# Altium PCB Vibration_Datalogger.PcbDoc (part 1 of 7)
Units mm, origin at the board's own origin, x right, y up, seen from the top; angles counter-clockwise.
Board outline 75.58 x 57.4 mm, 4 copper layers (Top Layer, Int1 (GND), Int2 (PWR), Bottom Layer), stack 1.44 mm thick; 126 components, 59 nets, 413 pads, 160 vias.
Unrouted connection lines stored in the file: 53.
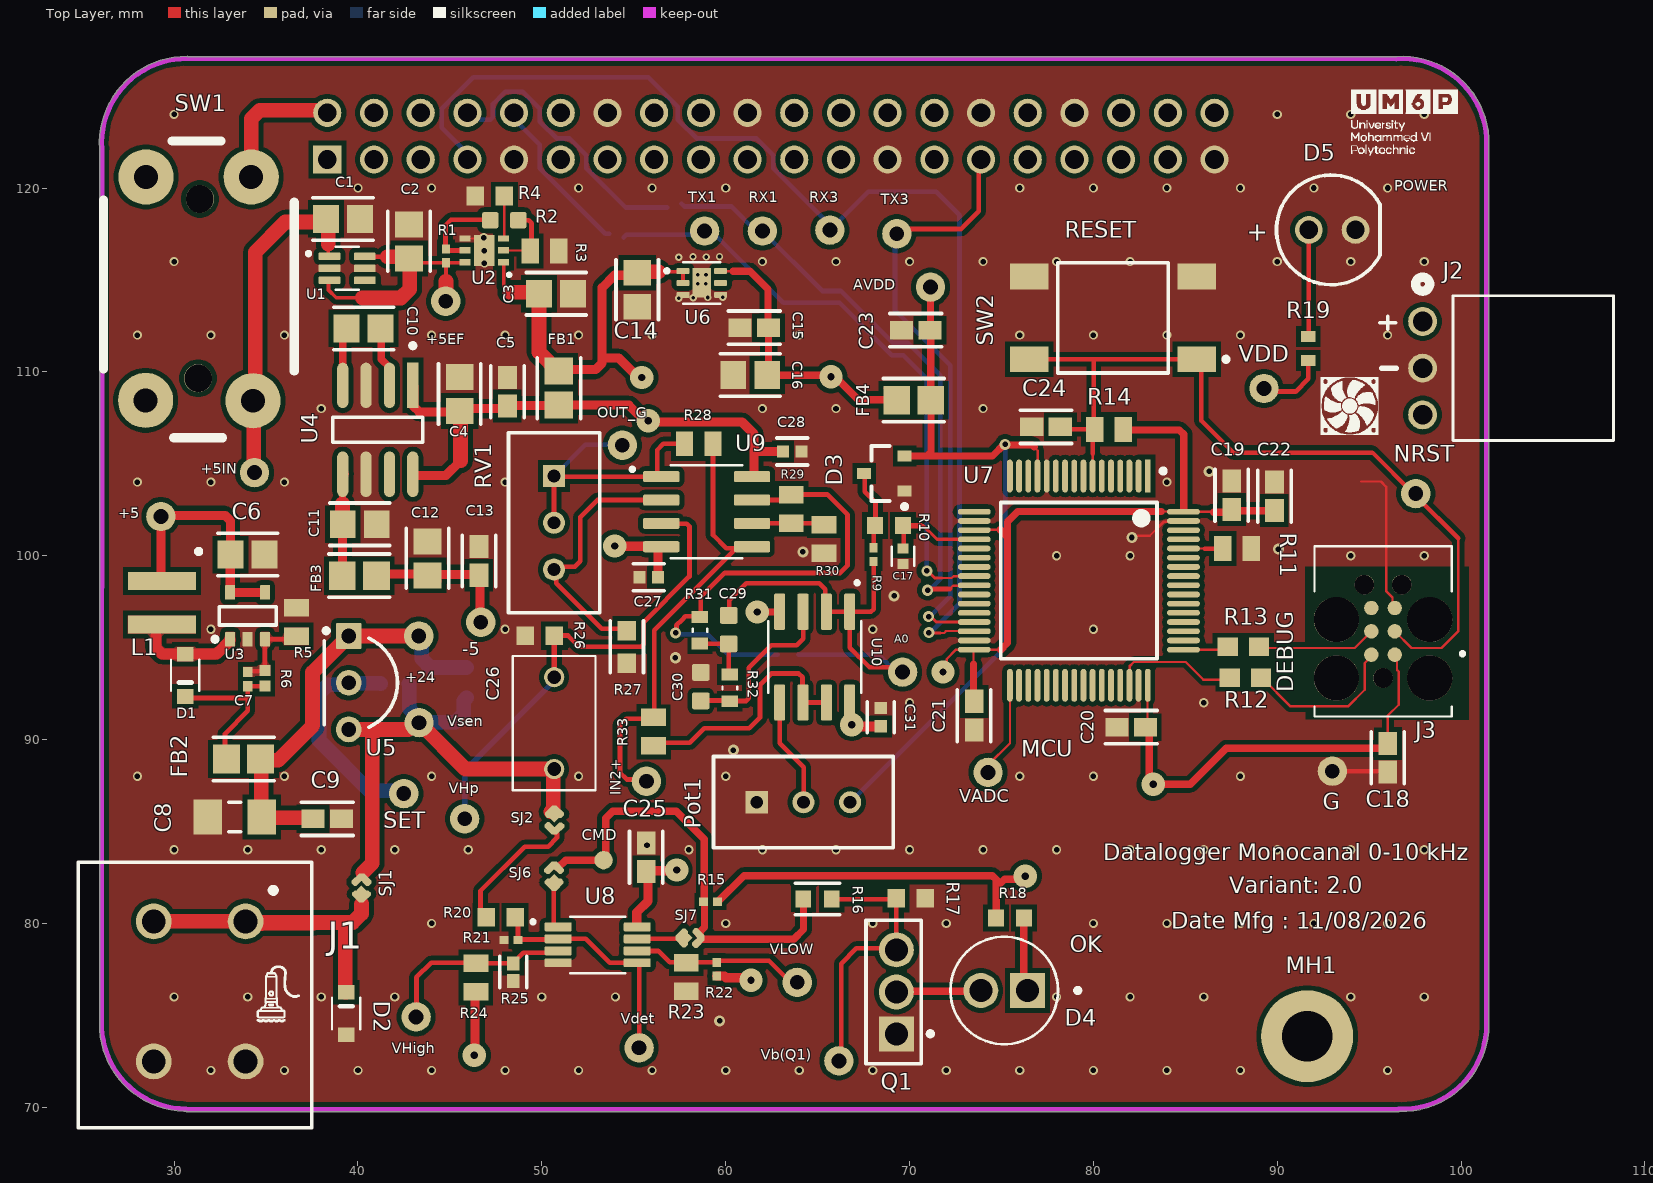
[diagram p0: Top Layer view]
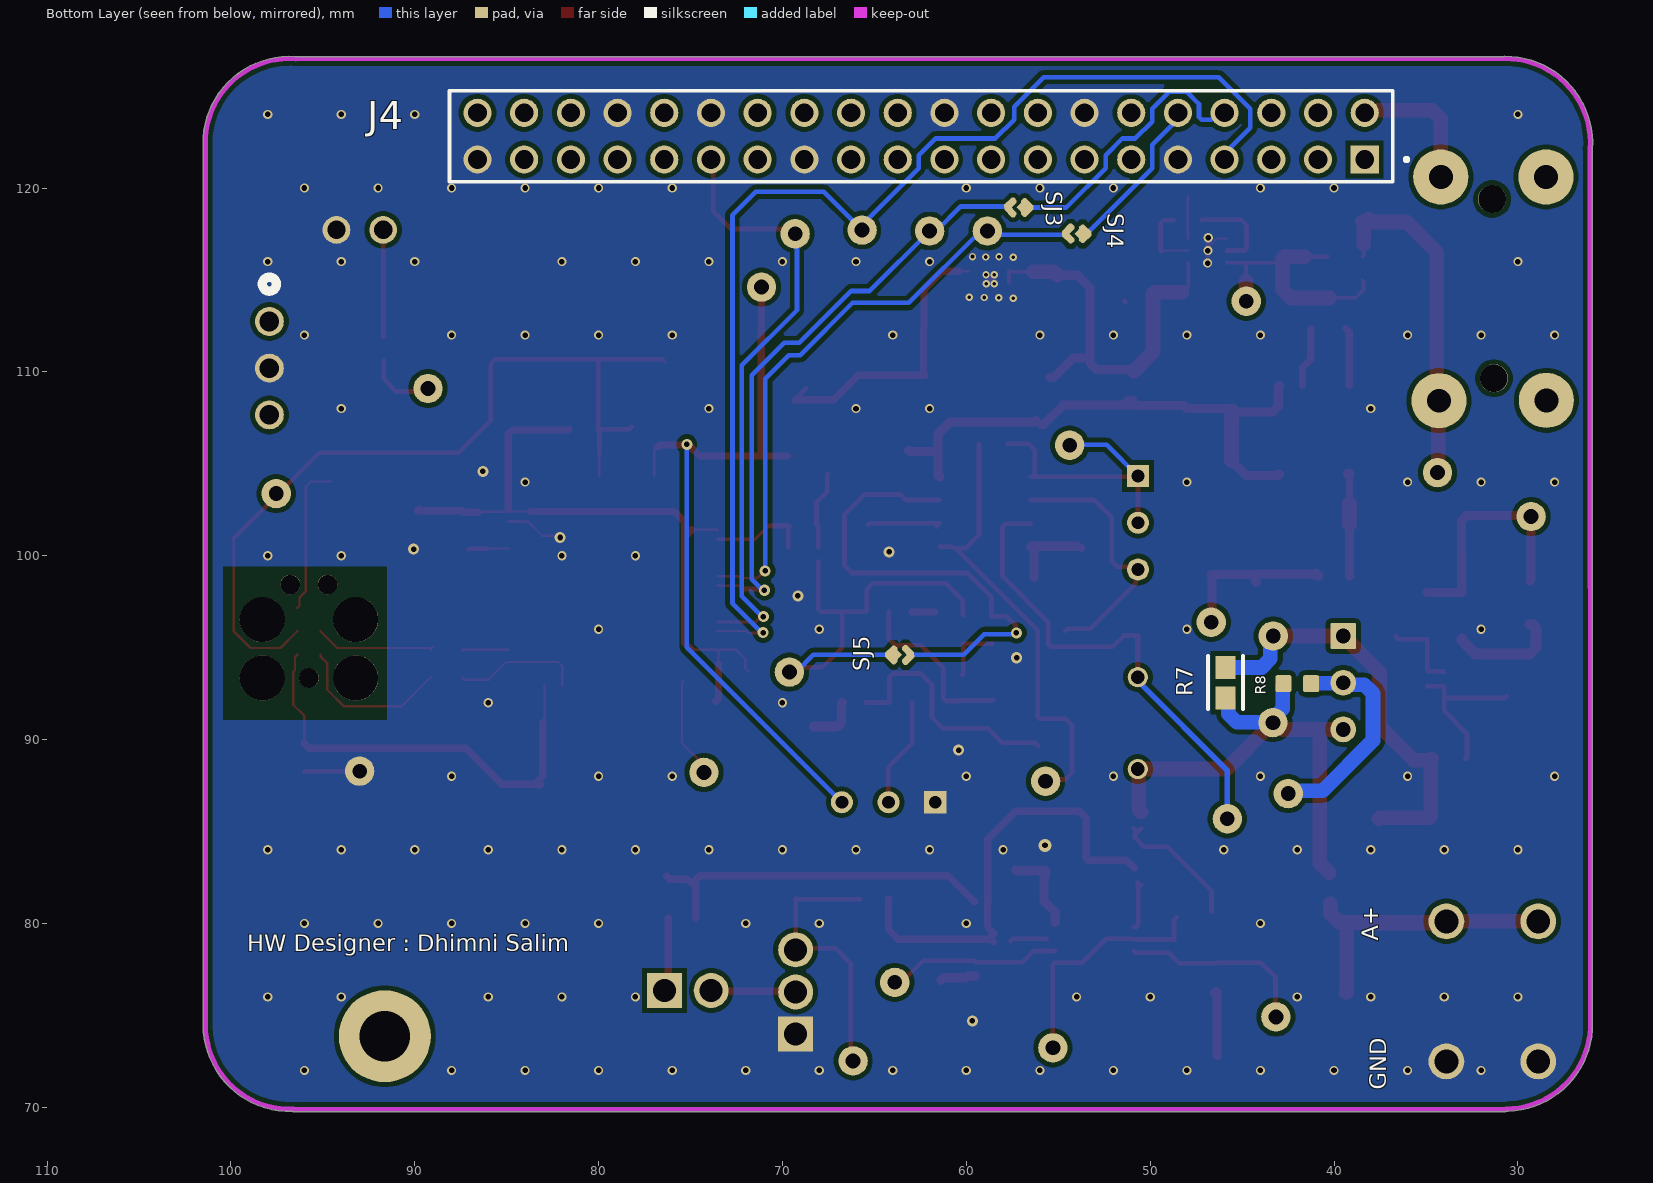
[diagram p1: Bottom Layer view, seen from below]
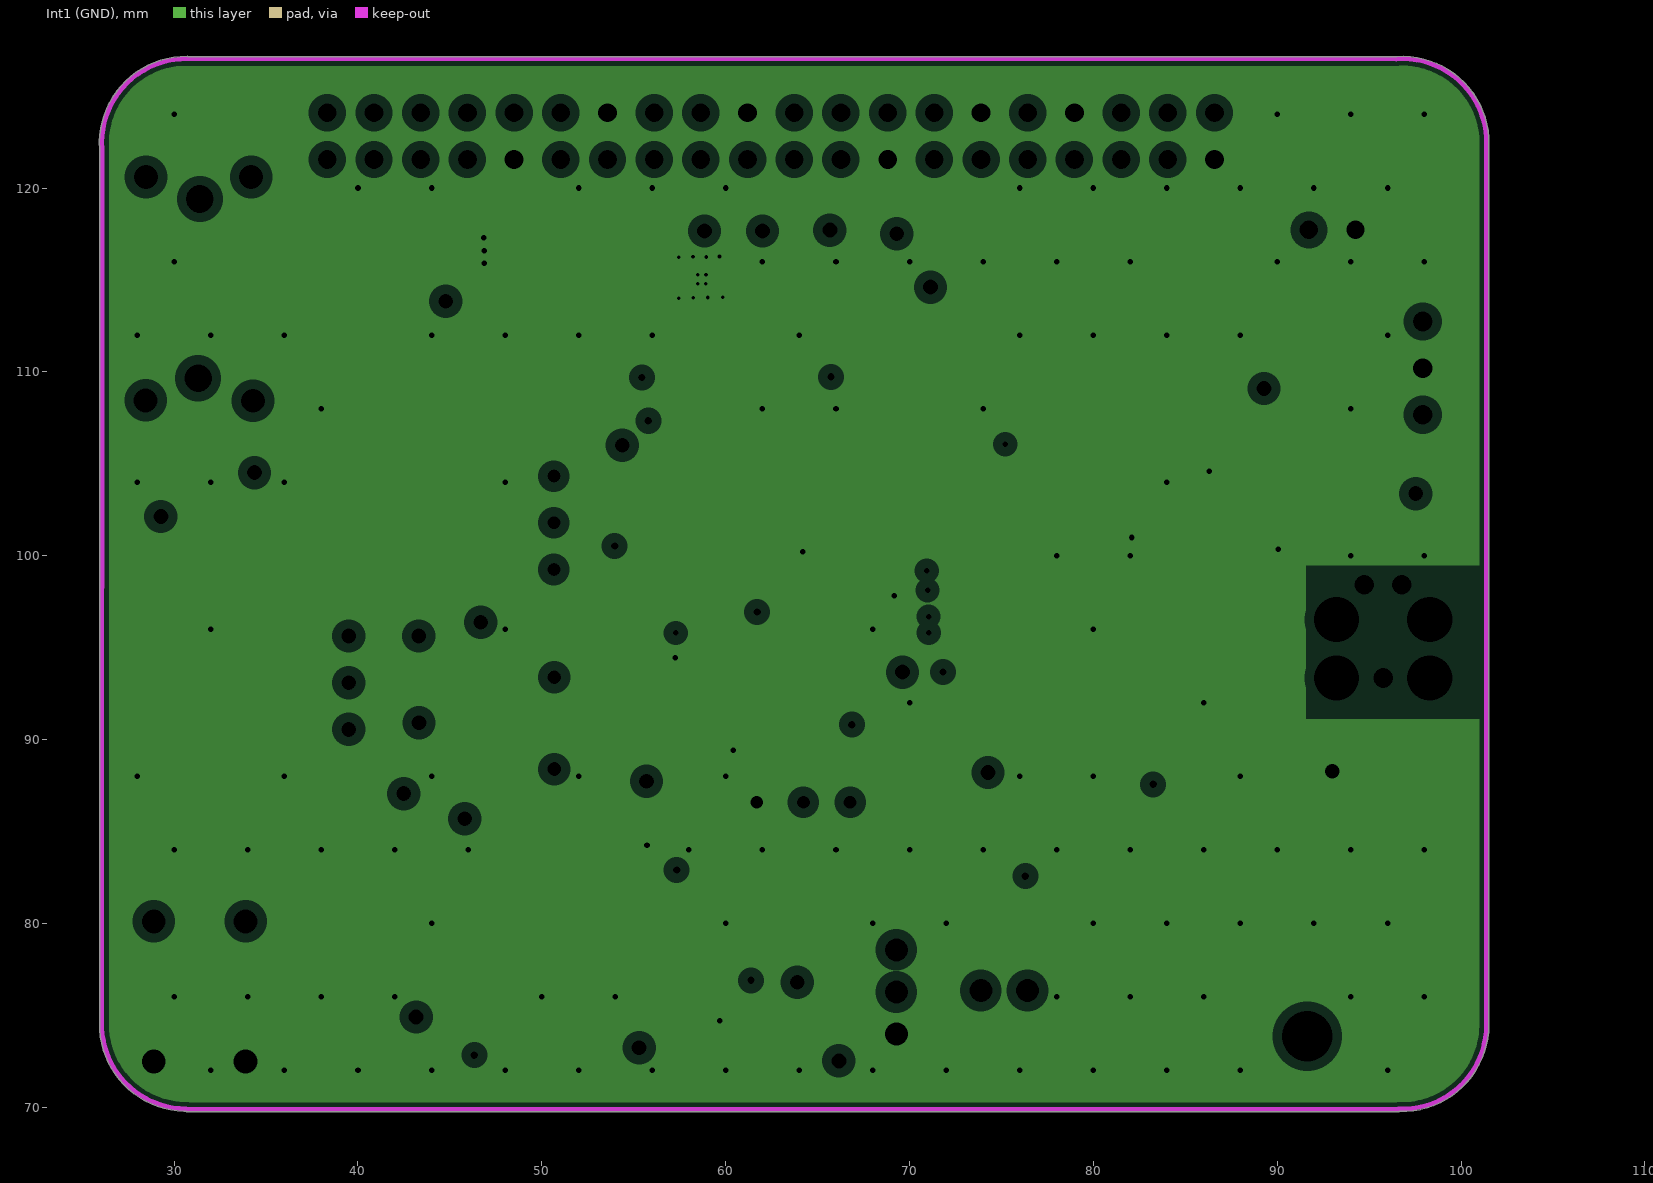
[diagram p2: Int1 (GND), clearances drawn from the general rule]
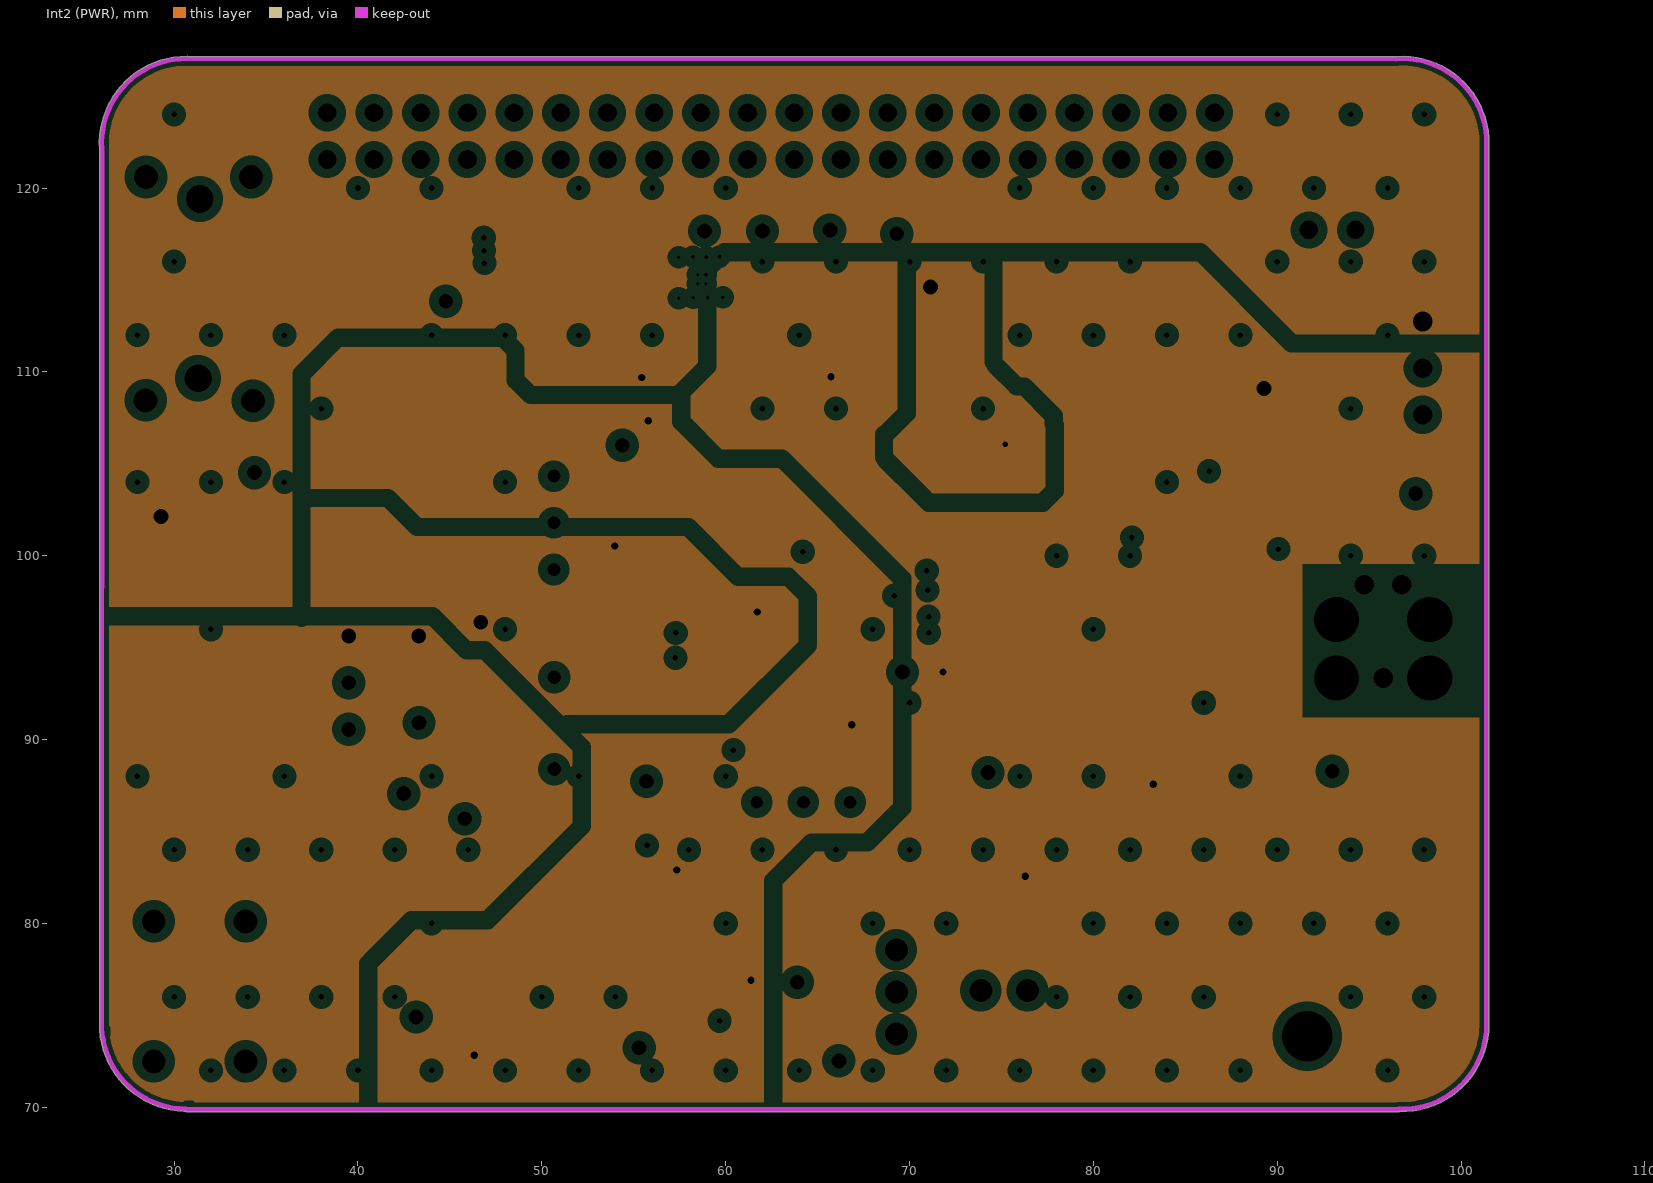
[diagram p3: Int2 (PWR), clearances drawn from the general rule]

## Layer stack, top to bottom
Top Solder: solder mask 0.0254, SM-001, Dk 4
Top Layer: signal copper 0.035
Dielectric 1: prepreg 0.15, PP-017, Dk 4.3
Int1 (GND): plane copper 0.035, net GND
Dielectric 3: core 1, Core-039, Dk 4.8
Int2 (PWR): plane copper 0.035, net (Multiple Nets)
Dielectric 5: prepreg 0.15, PP-017, Dk 4.3
Bottom Layer: signal copper 0.035
Bottom Solder: solder mask 0.0254, SM-001, Dk 4

## Board outline
30.542,69.781 ccw(c30.64,70.15) 30.64,69.768 ccw(c30.64,70.023) 30.66,69.769 ccw(c30.7,69.89) 30.7,69.763 96.61,69.763 ccw(c96.61,69.89) 96.656,69.771 ccw(c96.785,74.495) 101.511,74.495 ccw(c96.785,74.495) 101.507,74.667 101.507,74.762 ccw(c101.13,74.82) 101.512,74.82 ccw(c101.384,74.82) 101.507,74.853 101.507,122.627 ccw(c101.384,122.66) 101.512,122.66 ccw(c101.13,122.66) 101.511,122.685 ccw(c101.13,122.71) 101.512,122.71 ccw(c101.13,122.71) 101.511,122.734 ccw(c96.795,122.435) 96.496,127.151 ccw(c96.52,126.77) 96.48,127.15 ccw(c96.44,126.77) 96.44,127.152 30.744,127.152 ccw(c30.71,127.029) 30.712,127.156 ccw(c30.661,122.431) 25.945,122.132 ccw(c26.072,122.14) 25.958,122.083 25.958,74.317 ccw(c26.33,74.23) 25.949,74.206 ccw(c30.665,74.505)

## Design rules (kind name [scope] priority, off if disabled: settings)
Clearance TPS61041 [InNet('NetD1_C')] p1: gap=0.5 ignorepadtopadclearanceinfootprint=FALSE
Clearance Power24V [InNetClass('Power_24V') vs InNetClass('Power_24V')] p2: gap=0.3 ignorepadtopadclearanceinfootprint=FALSE except(0.01: SMDPad-SMDPad)
Clearance [All] p3: gap=0.254 ignorepadtopadclearanceinfootprint=FALSE except(0: Arc-Hole Track-Hole SMDPad-Hole THPad-Hole Via-Hole Fill-Hole Poly-Hole Region-Hole Text-Hole; 0.01: SMDPad-SMDPad; 0.175: Arc-SMDPad Track-SMDPad)
ComponentClearance "IC to Connector" [InComponentClass('Connecteur ') vs InComponentClass('IC')] p1: gap=3 collisioncheckmode=3 verticalgap=0.254 showdistances=FALSE
ComponentClearance "IC to Passif" [InComponentClass('IC') vs InComponentClass('Passif  ')] p2: gap=0.5 collisioncheckmode=3 verticalgap=0.254 showdistances=FALSE
ComponentClearance "Analog to digital clearance" [InComponentClass('Analog') vs InComponentClass('Digital')] p3: gap=10 collisioncheckmode=3 verticalgap=0.254 showdistances=FALSE
ComponentClearance "Passif to Passif" [InComponentClass('Passif  ') vs InComponentClass('Passif  ')] p4: gap=0.254 collisioncheckmode=3 verticalgap=0.254 showdistances=FALSE
ComponentClearance "IC To IC" [InComponentClass('IC') vs InComponentClass('IC')] p5: gap=3 collisioncheckmode=3 verticalgap=0.254 showdistances=FALSE
HoleSize [All] p1: absolutevalues=TRUE maxlimit=3 minlimit=0.025 maxpercent=80.000 minpercent=20.000
HoleToHoleClearance [All] p1: gap=0.1 allowstackedmicrovias=TRUE
MinimumSolderMaskSliver [All] p1 off: minsoldermaskwidth=0.1
MinimumSolderMaskSliver Exception_MFR [InPadClass('Exception') vs InPadClass('Exception')] p2: minsoldermaskwidth=0
PlaneClearance [All] p1: clearance=0.508
PlaneConnect [All] p1: planeconnectstyle=Direct reliefexpansion=0.508 reliefentries=4 reliefconductorwidth=0.254 reliefairgap=0.254
PolygonConnect [All] p1: connectstyle=Direct reliefconductorwidth=0.254 reliefentries=4 polygonreliefangle="90 Angle" airgapwidth=0.254
ReturnPath [All] p1: _gaplimit=0 _useantipads=TRUE
RoutingPriority [InNetClass('Power_24V')] p1: routingpriority=1
RoutingPriority RoutingPriority_1 [InNetClass('Analog')] p2: routingpriority=2
RoutingPriority RoutingPriority_2 [InNetClass('Power_Analog')] p3: routingpriority=3
RoutingVias [All] p1: holewidth=0.711 width=1.27 viastyle="Through Hole" minholewidth=0.711 minwidth=1.27 maxholewidth=0.711 maxwidth=1.27
SilkToSolderMaskClearance [All] p1: minsilkscreentomaskgap=0.15 clearancetoexposedcopper=TRUE
SolderMaskExpansion [All] p1: expansion=0.102 istentingtop=FALSE
Width Digital_Signal [InNetClass('Digital')] p1: maxlimit=0.254 minlimit=0.125 preferedwidth=0.175
Width Analog_Signal [InNetClass('Analog')] p2: maxlimit=0.3 minlimit=0.175 preferedwidth=0.25 minimp=50.000000 maximp=50.000000 favimp=50.000000
Width Power_3V3 [InNetClass('POWER_3V3')] p3: maxlimit=0.8 minlimit=0.125 preferedwidth=0.4 minimp=50.000000 maximp=50.000000 favimp=50.000000
Width Power_Analog [InNetClass('Power_Analog')] p4: maxlimit=0.8 minlimit=0.4 preferedwidth=0.5
Width Power_5V [InNetClass('Power_5V')] p5: maxlimit=1.5 minlimit=0.2 preferedwidth=0.8 minimp=50.000000 maximp=50.000000 favimp=50.000000
Width Power_24 [InNetClass('Power_24')] p6: maxlimit=2 minlimit=0.6 preferedwidth=1.2 minimp=50.000000 maximp=50.000000 favimp=50.000000
22 further rules are at their usual default settings.

## Classes and differential pairs
component class MCU_Room: AVDD C18 C23 C26 C30 J4 R9 R12 U7 VADC VDD
component class Détection_Fail_Room: D5 Q1 R15 R16 R17 R18 R19 R22 R23 R24 U8
component class Connecteur: J1 J2 J4
component class IC: U1 U2 U4 U5 U6 U7 U8 U9 U10 é
component class Passif: C1 C2 C3 C4 C5 C6 C10 C15 C16 C18 C23 C26 C29 C30 R1 R2 R3 R4 R5 R6 R7 R9 R12 R13 R15 R16 R17 R18 R19 R22 R23 R24 R27 R30 R32 R33 RV1 RX1 RX3
pad class Exception: R6-1 R6-2 R10-1 R10-2 SJ1-1 SJ1-2 U2-1 U2-2 U2-3 U2-4 U2-5 U2-6 U2-7 U6-1 U6-2 U6-3 U6-4 U6-5 U6-6 U6-7
net class Power_3V3: AVDD CMD NetD4_2 NetD5_1 VDD
net class Digital: NetJ3_2 NetJ3_4 NetR4_2 NRST OVLO SWCLK SWDIO UART1_RX UART1_TX UART3_RX UART3_TX UVLO VADC_OUT
net class Analog: +INA +INB A0 NetC29_1 NetC30_1 NetD2_3 NetPot1_2 NetR27_1 NetR29_2 NetR33_2 OUTA PA4 VHigh VLow
net class Power_Analog: 5V_ANA NetC10_1 NetC10_2 NetC11_2
net class Power_5V: +5 +5_RASP +5EF +5IN
net class Power_24V: 24V NetD2_1 NetR8_2 Vsen
component class Puissance: +5 +5EF +5IN +24 -5 AVDD C1 C2 C3 C6 C10 C15 C23 D1 FB1 FB4 L1 R1 R2 R3 R4 R5 R6 SW1 U1 U2 U4 U6 U9 VDD é
component class Analog: A0 C23 C26 C29 C30 D3 IN2+ J1 OUT_G Pot1 R7 R9 R24 R27 R30 R32 R33 RV1 SET SJ1 U5 U9 U10
component class Digital: C16 C18 C23 C26 C30 J4 NRST R9 R12 R13 R17 RX1 RX3 SW2 TX1 TX3 U7
component class Vibration_Datalogger_1: +5 +5EF +5IN +24 -5 A0 AVDD C1 C2 C3 C4 C5 C6 C10 C13 C15 C16 C18 C23 C26 C29 C30 CMD D1 D3 D5 FB1 FB2 FB3 FB4 G IN2+ J1 J2 J4 L1 MH1 NRST OUT_G Pot1 Q1 R1 R2 R3 R4 R5 R6 R7 R9 R12 R13 R15 R16 R17 R18 R19 R22 R23 R24 R27 R30 R31 R32 R33 RV1 RX1 RX3 SET SJ1 SJ2 SJ3 SJ4 SW1 SW2 TX1 TX3 U1 U2 U4 U5 U6 U7 U8 U9 U10 VADC Vb(Q1) VDD Vdet VHigh VHp VLOW Vsen é

## Components (designator, comment, footprint, x,y, rotation, side; value= is the part's Value field where it differs from the comment)
+5 "Test_point_TH" TEST_POINT_TH -19.138,105.718 r270 top
+5EF "Test_point_TH" TEST_POINT_TH 48.358,162.258 r180 top
+5IN "Test_point_TH" TEST_POINT_TH 82.788,100.932 r90 top
+24 "Test_point_TH" TEST_POINT_TH 46.895,144.049 r180 top
-5 "Test_point_TH" TEST_POINT_TH 50.268,144.798 r180 top
A0 "Test_point_TH" TEST_POINT_TH 73.208,142.088 r180 top
AVDD "Test_point_TH" TEST_POINT_TH 119.558,111.022 r90 top
C1 "GRM21BR71A106KA73L" GRM21BR71A106KA73L 39.253,115.8 r0 top
C2 "GRM21BR71A106KA73L" GRM21BR71A106KA73L 45.3,117.165 r90 top
C3 "GRM21BR71A106KA73L" GRM21BR71A106KA73L 50.843,111.73 r0 top
C4 "GRM21BR71A106KA73L" GRM21BR71A106KA73L 48.05,108.865 r90 top
C5 "CC0603KRX7R9BB104" CC0603KRX7R7BB104 48.668,112.215 r90 top
C6 "GRM21BR61E106KA73L" GRM21BR61E106KA73L 30.057,99.766 r0 top
C7 "GRM1555C1H220JA01D" GRM1555C1H220JA01D 33.99,93.24 r90 top
C8 "CL31B106KBHNNNE" CL31B106KBHNNNE 29.774,85.77 r180 top
C9 "CC0603KRX7R9BB104" CC0603KRX7R7BB104 41.629,85.152 r0 top
C10 "GRM21BR71A106KA73L" GRM21BR71A106KA73L 40.235,114.88 r180 top
C11 "GRM21BR71A106KA73L" GRM21BR71A106KA73L 40.025,104.23 r180 top
C12 "GRM21BR71A106KA73L" GRM21BR71A106KA73L 41.26,99.785 r270 top
C13 "CC0603KRX7R9BB104" CC0603KRX7R7BB104 47.118,103.015 r90 top
C14 "GRM21BR61E106KA73L" GRM21BR61E106KA73L 54.896,118.403 r270 top
C15 "CC0603KRX7R9BB104" CC0603KRX7R7BB104 58.251,112.938 r180 top
C16 "GRM21BR61E106KA73L" GRM21BR61E106KA73L 65.271,110.124 r180 top
C17 "CC0402KRX7R9BB102" CC0402KRX7R9BB102 70.507,99.987 r270 top
C18 "CC0603KRX7R9BB104" CC0603KRX7R7BB104 95.474,85.71 r270 top
C19 "CC0603KRX7R9BB104" CC0603KRX7R7BB104 88.058,106.595 r90 top
C20 "CC0603KRX7R9BB104" CC0603KRX7R7BB104 78.761,91.208 r180 top
C21 "CC0603KRX7R9BB104" CC0603KRX7R7BB104 72.972,88.001 r270 top
C22 "CC0603KRX7R9BB104" CC0603KRX7R7BB104 90.388,106.529 r90 top
C23 "CC0603KRX7R9BB104" CC0603KRX7R7BB104 73.645,111.73 r0 top
C24 "CC0603KRX7R9BB104" CC0603KRX7R7BB104 74.121,107.548 r180 top
C25 "CC0603KRX7R9BB104" CC0603KRX7R7BB104 56.208,86.899 r90 top
C26 "B32529C0105J189" B32529C0105J189 54.289,92.924 r90 top
C27 "CC0402KRX7R7BB104" CC0402KRX7R7BB104 53.512,98.87 r180 top
C28 "CC0402KRX7R7BB104" CC0402KRX7R7BB104 65.924,105.63 r0 top
C29 "C0603C103K5RAC7411" C0603C103K5RAC7411 60.06,95.97 r90 top
C30 "C0603C103K5RAC7411" C0603C103K5RAC7411 58.54,92.87 r90 top
C31 "CC0402KRX7R7BB104" CC0402KRX7R7BB104 68.4,88.912 r270 top
CMD "Test_Point_SMD" TEST_POINT_SMD 55.643,83.467 r90 top
D1 "CUS05S40,H3F" CUS05S40,H3F 30.58,93.47 r90 top
D2 "CUS05S40,H3F" CUS05S40,H3F 39.379,75.126 r270 top
D3 "BAS40-04" BAS40-04 66.324,104.552 r180 top
D4 "LTL-4231N" LTL-4233 74.9,80.848 r180 top
D5 "151051BS04000" 151051BS04000 92.964,117.729 r0 top
FB1 "BLM21PG221SN1D" BLM21PG221SN1D 51.261,105.169 r270 top
FB2 "BLM21PG221SN1D" BLM21PG221SN1D 37.721,89.271 r0 top
FB3 "BLM21PG221SN1D" BLM21PG221SN1D 44.023,99.241 r0 top
FB4 "BLM21AG601SN1D" FP-BLM21-0_2-t0_85-e0_5-IPC_A 70.231,108.458 r0 top
G "Test_point_TH" TEST_POINT_TH 96.588,136.698 r180 top
IN2+ "Test_point_TH" TEST_POINT_TH 59.278,136.148 r180 top
J1 "691411410002" 691411410002 32.854,87.095 r270 top locked
J2 "0022288032" 0022288032 97.716,101.564 r90 top locked
J3 "8.06.16 J-LINK" "8.06.16 J-LINK" 97.646,96.229 r90 top locked
J4 "ESQ-120-23-G-D" ESQ-120-23-G-D 63.095,118.248 r180 bottom locked
L1 "74438357100" 74438357100 32.916,98.919 r270 top
MH1 "Mounting Hole" "MOUNTING HOLE" 91.678,70.702 r0 top locked
NRST "Test_point_TH" TEST_POINT_TH 101.124,151.796 r180 top
OUT_G "Test_point_TH" TEST_POINT_TH 57.968,154.428 r180 top
Pot1 "3296W-1-103LF" 3296W-1-103LF 63.669,90.497 r270 top locked (schematic designator POT1)
Q1 "BD139G" FP-77-09-MFG 69.13,76.27 r180 top
R1 "RC0402FR-1333KL" RC0402FR-1333KL 44.192,116.26 r270 top
R2 "RC0603FR-071K8L" RC0603FR-071K8L 48.06,119.273 r270 top
R3 "RG2012N-103-W-T1" RG2012N-103-W-T1 50.121,115.464 r0 top
R4 "ERA-3ARW104V" ERA-3ARW104V 45.133,119.561 r0 top
R5 "RG2012N-103-W-T1" RG2012N-103-W-T1 35.544,96.399 r270 top
R6 "RMCF0402FT187K" RMCF0402FT187K 35.775,93.382 r270 top
R7 "ERA-3AEB302V" ERA-3AEB302V 45.98,93.15 r90 bottom
R8 "CPF0603B16R9E1" CPF0603B16R9E1 41.99,93.06 r180 bottom
R9 "RC0402FR-074K7L" RC0402FR-074K7L 67.421,100.121 r270 top
R10 "RNCF0603BTE100R" RNCF0603BTE100R 68.987,100.104 r0 top
R11 "RG2012N-103-W-T1" RG2012N-103-W-T1 87.801,99.284 r0 top
R12 "RC0603FR-0747RL" RC0603FR-0747RL 88.223,92.474 r180 top
R13 "RC0603FR-0747RL" RC0603FR-0747RL 88.113,94.154 r180 top
R14 "RG2012N-103-W-T1" RG2012N-103-W-T1 80.859,107.976 r180 top
R15 "RC0402FR-074K7L" RC0402FR-074K7L 59.109,80.561 r0 top
R16 "RT0603DRD072K2L" RT0603DRD072K2L 64.94,79.847 r0 top
R17 "ERA-3ARW104V" ERA-3ARW104V 72.097,81.369 r180 top
R18 "RNCF0603BTE100R" RNCF0603BTE100R 75.363,81.826 r180 top
R19 "RC0603FR-0710RL" RC0603FR-0710RL 90.416,111.281 r270 top
R20 "ERA-3ARW104V" ERA-3ARW104V 49.797,80.339 r180 top
R21 "RC0402FR-0722KL" RC0402FR-0722KL 48.409,77.985 r0 top
R22 "RC0402FR-0722KL" RC0402FR-0722KL 58.405,77.421 r270 top
R23 "RG2012N-103-W-T1" RG2012N-103-W-T1 56.744,77.109 r270 top
R24 "RG2012N-103-W-T1" RG2012N-103-W-T1 47.52,77.04 r90 top
R25 "RT0402BRD0715KL" RT0402BRD0715KL 48.121,79.741 r90 top
R26 "ERA-3ARW104V" ERA-3ARW104V 47.853,95.641 r0 top
R27 "RC0603FR-071KL" RC0603FR-071KL 52.733,94.882 r270 top
R28 "RG2012N-103-W-T1" RG2012N-103-W-T1 58.549,107.196 r180 top
R29 "RG2012N-103-W-T1" RG2012N-103-W-T1 62.464,102.549 r270 top
R30 "RG2012N-103-W-T1" RG2012N-103-W-T1 64.244,100.919 r270 top
R31 "ERA-3AEB1331V" ERA-3AEB1331V 58.659,95.978 r270 top
R32 "ERA-3AEB1331V" ERA-3AEB1331V 60.29,92.84 r270 top
R33 "RG2012N-103-W-T1" RG2012N-103-W-T1 54.974,90.439 r270 top
RV1 "3296W-1-103LF" 3296W-1-103LF 54.567,102.351 r180 top
RX1 "Test_point_TH" TEST_POINT_TH 13.582,121.248 r270 top
RX3 "Test_point_TH" TEST_POINT_TH 17.252,121.298 r270 top
SET "Test_point_TH" TEST_POINT_TH 46.078,135.478 r180 top
SJ1 "Solder Jumper" "Solder Jumper" 39.476,81.903 r270 top
SJ2 "Solder Jumper" "Solder Jumper" 51.391,85.639 r90 top
SJ3 "Solder Jumper" "Solder Jumper" 57.121,118.229 r180 bottom
SJ4 "Solder Jumper" "Solder Jumper" 53.973,116.803 r180 bottom
SJ5 "Solder Jumper" "Solder Jumper" 63.647,95.317 r0 bottom
SJ6 "Solder Jumper" "Solder Jumper" 49.959,82.541 r270 top
SJ7 "Solder Jumper" "Solder Jumper" 58.041,79.921 r180 top
SW1 "SPEF110100" SPEF110100 31.32,113.77 r270 top locked
SW2 "TL3301AF260QG" TL3301AF260QG 81.18,112.96 r180 top locked
TX1 "Test_point_TH" TEST_POINT_TH 107.268,114.072 r90 top
TX3 "Test_point_TH" TEST_POINT_TH 72.898,165.928 r180 top
U1 "LM66100DCKR" LM66100DCKR 39.46,114.01 r0 top
U2 "TPS25961DRVR" TPS25961DRVR 46.93,115.3 r180 top
U3 "TPS61041DBVR" TPS61041DBVR 33.79,96.74 r90 top
U4 "MAX660ESA+" MAX660ESA+ 44.804,107.433 r270 top
U5 "LM234Z-3/NOPB" LM234Z-3/NOPB 48.26,92.279 r0 top locked
U6 "TPS7B8233QWDRVRQ1" TPS7B8233QWDRVRQ1 61.226,114.57 r0 top
U7 "STM32F303RET6" STM32F303RET6 77.416,98.648 r270 top locked
U8 "TLV1702AIDGKR" TLV1702AIDGKR 53.05,78.89 r0 top
U9 "OPA2192IDR" OPA2192IDR 59.09,102.58 r0 top
U10 "OPA2192IDR" OPA2192IDR 65.03,94.36 r270 top
VADC "Test_point_TH" TEST_POINT_TH 77.858,136.628 r180 top
Vb(Q1) "Test_point_TH" TEST_POINT_TH 17.742,76.108 r270 top
VDD "Test_point_TH" TEST_POINT_TH 40.863,112.681 r270 top
Vdet "Test_point_TH" TEST_POINT_TH 103.708,69.642 r90 top
VHigh "Test_point_TH" TEST_POINT_TH 39.572,26.492 r0 top
VHp "Test_point_TH" TEST_POINT_TH 49.388,134.108 r180 top
VLOW "Test_point_TH" TEST_POINT_TH 67.478,125.208 r180 top
Vsen "Test_point_TH" TEST_POINT_TH 46.908,139.338 r180 top

## Footprints (in the part's own frame and the unit in brackets; to place one, negate y for a bottom-side part, rotate by r counter-clockwise, add the part's x,y. Pads: shape width x height; smd on the part's side, far side on the other; paste and mask are expansions set on the pad)
"8.06.16 J-LINK" [mm] "6-pin Needle Adapter (8.06.16)"
  round 0.787 smd paste-1: 1(-1.614,1.253) 2(-1.614,2.523) 3(-0.344,1.253) 4(-0.344,2.523) 5(0.926,1.253) 6(0.926,2.523)
  round 2.451 hole 2.451 unplated: ""(-2.884,4.428) ""(-2.884,-0.652) ""(0.291,4.428) ""(0.291,-0.652)
  round 1.067 hole 1.067 unplated: ""(-2.884,1.888) ""(2.196,0.872) ""(2.196,2.904)
  silkscreen extent -4.98,-2.53 4.29,5.62
3296W-1-103LF [mm] "TRIMMER 10K OHM 0.5W PC PIN TOP"
  rect 1.2x1.2 hole 0.7 paste-1000 mask+0: 1(3.907,-1.979)
  round 1.2 hole 0.7 paste-1000 mask+0: 2(3.907,0.561) 3(3.907,3.101)
  silkscreen extent 1.42,-4.33 6.38,5.45, body extent 1.32,-4.43 6.48,5.55, height 0.25
151051BS04000 [mm] "LED BLUE DIFFUSED 5MM ROUND T/H"
  round 1.508 hole 1: 1(-1.245,-0.008) 2(1.295,-0.008)
  silkscreen extent -3,-2.99 2.63,2.98, body extent -3.05,-2.96 2.35,2.94, height 18.7
0022288032 [mil] "CONN HEADER R/A 3POS 2.54MM"
  round 62 hole 42: 1(440,-7.64) 2(340,-7.64) 3(240,-7.64)
  silkscreen extent 185,-417 535,7, body extent 185,-412 485,5, height 109
74438357100 [mm] "10 µH Shielded Molded Inductor 2.7 A"
  rect 0.98x3.7 smd: 1(0.299,-3.586) 2(2.669,-3.586)
  silkscreen extent -1.42,-1.69 -1.22,-1.49, body extent -0.62,-5.62 3.48,-1.52, height 3.23
691411410002 [mm] "TERM BLK 2P SIDE ENT 7.62MM PCB"
  round 1.95 hole 1.3 mask+0.102: 1(6.985,1.036) 2(14.605,1.036) A1(6.985,-3.964) A2(14.605,-3.964)
  silkscreen extent 3.76,-8.06 18.21,4.64, body extent 3.58,-7.95 17.77,4.55, height 13.9
B32529C0105J189 [mm] "CAP FILM 1UF 5% 63VDC RADIAL"
  round 1.1 hole 0.75: 1(-4.532,3.616) 2(0.468,3.616)
  silkscreen extent -5.68,1.37 1.62,5.87, body extent -5.68,1.37 1.62,5.87, height 9.5
BAS40-04 [mm] "DIODE ARR SCHOTT 40V 200MA SOT23"
  rect 0.75x0.6 smd: 1(-3.406,1.032) 2(-3.406,-0.868) 3(-1.206,0.082)
  silkscreen extent -3.53,-1.42 -1.61,2.01, body extent -3.01,-1.42 -1.61,1.58, height 1.1
BLM21PG221SN1D [mm] "FERRITE BEAD 220 OHM 0805 1LN"
  rect 1.455x1.556 smd paste+0 mask+0: 1(-4.873,-0.331) 2(-3.021,-0.331)
  silkscreen extent -5.6,-1.51 -2.29,0.85, body extent -6.1,-1.61 -1.79,0.95, height 0.25
C0603C103K5RAC7411 [mm] "CAP CER 10000PF 50V X7R 0603"
  rrect25% 0.92x0.97 smd: 1(-0.764,-0.104) 2(0.786,-0.104)
  body extent -0.79,-0.5 0.81,0.3, height 0.9
CC0402KRX7R7BB104 [mm] "CAP CER 0.1UF 16V X7R 0402"
  rect 0.668x0.672 smd paste+0 mask+0: 1(-2.808,0.04) 2(-1.804,0.04)
  silkscreen extent -3.14,-0.7 -1.47,0.78, body extent -3.34,-0.5 -1.27,0.58, height 0.25
CC0402KRX7R9BB102 [mm] "CAP CER 1000PF 50V X7R 0402"
  rect 0.54x0.6 smd: 1(-0.413,-0.867) 2(0.447,-0.867)
  silkscreen extent -0.51,-1.48 0.54,-0.25, body extent -0.48,-1.12 0.52,-0.62, height 0.55
CC0603KRX7R7BB104 [mm] "CAP CER 0.1UF 16V X7R 0603"
  rect 1.258x1.012 smd paste+0 mask+0: 1(-4.079,0.538) 2(-2.525,0.538)
  silkscreen extent -4.71,-0.37 -1.9,1.44, body extent -5.21,-0.47 -1.4,1.54, height 0.25
CL31B106KBHNNNE [mm] "CAP CER 10UF 50V X7R 1206"
  rect 1.554x1.906 smd paste+0 mask+0: 1(-4.998,-0.02) 2(-2.046,-0.02)
  silkscreen extent -3.85,-0.82 -3.2,0.78, body extent -6.28,-1.47 -0.77,1.43, height 0.25
CPF0603B16R9E1 [mm] "CMS CPF 0603 16R9 0.1% 25PPM"
  rrect25% 0.87x0.93 smd paste+0 mask+0.102: 1(-0.763,-0.021) 2(0.747,-0.021)
  body extent -0.78,-0.42 0.77,0.38, height 0.55
CUS05S40,H3F [mm] "DIODE SCHOTTKY 40V 500MA USC"
  rect 0.8x0.9 smd paste+0 mask+0.102: 1(-1.124,-0.019) 2(1.176,-0.019)
  silkscreen extent -0.82,-0.79 0.88,0.75, body extent -1.2,-0.62 1.3,0.63, height 1.15
ERA-3AEB302V [mm] "RES SMD 3K OHM 0.1% 1/10W 0603"
  rect 1.255x1.106 smd paste+0 mask+0: 1(-0.882,-0.078) 2(0.769,-0.078)
  silkscreen extent -1.51,-1.03 1.4,0.87, body extent -0.86,-0.48 0.74,0.32, height 0.55
ERA-3AEB1331V [mm] "RES SMD 1.33KOHM 0.1% 1/10W 0603"
  rect 0.65x0.9 smd: 1(-0.692,-0.059) 2(0.758,-0.059)
  silkscreen extent -0.05,-0.46 0.11,0.34, body extent -0.75,-0.37 0.85,0.43, height 0.45
ERA-3ARW104V [mm] "RES SMD 100KOHM 0.05% 1/10W 0603"
  rect 0.94x1.02 smd paste+0 mask+0.102: 1(1.247,-0.001) 2(2.827,-0.001)
  body extent 1.24,-0.4 2.84,0.4, height 0.45
ESQ-120-23-G-D [mm] "CONN SOCKET 40POS 0.1 GOLD PCB"
  rect 1.53x1.53 hole 1.02 mask+0.102: 01(24.765,3.302)
  round 1.53 hole 1.02 mask+0.102: 02(24.765,5.842) 03(22.225,3.302) 04(22.225,5.842) 05(19.685,3.302) 06(19.685,5.842) 07(17.145,3.302) 08(17.145,5.842) 09(14.605,3.302) 10(14.605,5.842) 11(12.065,3.302) 12(12.065,5.842) 13(9.525,3.302) 14(9.525,5.842) 15(6.985,3.302) 16(6.985,5.842) 17(4.445,3.302) 18(4.445,5.842) 19(1.905,3.302) 20(1.905,5.842) 21(-0.635,3.302) 22(-0.635,5.842) 23(-3.175,3.302) 24(-3.175,5.842) 25(-5.715,3.302) 26(-5.715,5.842) 27(-8.255,3.302) 28(-8.255,5.842) 29(-10.795,3.302) 30(-10.795,5.842) 31(-13.335,3.302) 32(-13.335,5.842) 33(-15.875,3.302) 34(-15.875,5.842) 35(-18.415,3.302) 36(-18.415,5.842) 37(-20.955,3.302) 38(-20.955,5.842) 39(-23.495,3.302) 40(-23.495,5.842)
  silkscreen extent -25.02,2.1 27.14,7.05, body extent -25.15,2.16 26.16,7.24, height 13.59
FP-77-09-MFG [mm]
  rect 1.9x1.9 hole 1.25 paste-1000 mask+0: 1(-0.155,2.29)
  round 1.9 hole 1.25 paste-1000 mask+0: 2(-0.155,0) 3(-0.155,-2.29)
  silkscreen extent -2.13,-3.9 1.5,3.9, body extent -1.6,-4 1.6,4, height 0.25
FP-BLM21-0_2-t0_85-e0_5-IPC_A [mm]
  rect 1.455x1.556 smd paste+0 mask+0: 1(-0.926,0) 2(0.926,0)
  silkscreen extent -1.65,-1.18 1.65,1.18, body extent -2.15,-1.28 2.15,1.28, height 0.25
GRM21BR61E106KA73L [mm] "CAP CER 10UF 25V X5R 0805"
  rect 1.406x1.508 smd paste+0 mask+0: 1(3.011,0.294) 2(4.863,0.294)
  silkscreen extent 2.31,-0.86 5.57,1.45, body extent 1.81,-0.96 6.07,1.55, height 0.25
GRM21BR71A106KA73L [mm] "CAP CER 10UF 10V X7R 0805"
  rect 1.406x1.508 smd paste+0 mask+0: 1(-0.995,2.52) 2(0.857,2.52)
  silkscreen extent -1.7,1.37 1.56,3.67, body extent -2.2,1.27 2.06,3.77, height 0.25
GRM1555C1H220JA01D [mm] "CAP CER 22PF 50V C0G/NP0 0402"
  rect 0.56x0.52 smd: 1(-0.347,-0.017) 2(0.433,-0.017)
  body extent -0.48,-0.29 0.57,0.26, height 0.55
LM234Z-3/NOPB [mm] "IC CURRENT SOURCE 1% TO92-3"
  rrect7% 1.4x1.4 hole 0.8: 1(-8.763,3.352)
  round 1.4 hole 0.8: 2(-8.763,0.812) 3(-8.763,-1.728)
  silkscreen extent -10.11,-1.6 -6.11,3.76, body extent -10.1,-2.02 -6.41,3.64, height 9.01
LM66100DCKR [mm] "IC OR CTRLR IDEAL DIODE SC70-6"
  rrect25% 1.19x0.4 smd: 1(-1.01,2.27) 2(-1.01,1.62) 3(-1.01,0.97) 4(0.91,0.97) 5(0.91,1.62) 6(0.91,2.27)
  silkscreen extent -2.25,0.45 0.58,2.79, body extent -1.1,0.62 1,2.62, height 1.1
LTL-4233 [mm] "LED GREEN DIFFUSED T-1 3/4 T/H"
  rect 1.9x1.9 hole 1.25 paste-1000 mask+0: 1(-1.52,4.498)
  round 1.9 hole 1.25 paste-1000 mask+0: 2(1.02,4.498)
  silkscreen extent -4.38,1.58 2.68,7.42, body extent -2.98,1.74 2.42,7.64, height 18.75
MAX660ESA+ [mm] "IC REG CHRG PUMP INV 100MA 8SOIC"
  rect 2.474x0.607 smd paste+0 mask+0: 1(-1.829,-1.824)
  rrect100% 2.474x0.607 smd paste+0 mask+0: 2(-1.829,-3.094) 3(-1.829,-4.364) 4(-1.829,-5.634) 5(3.003,-5.634) 6(3.003,-4.364) 7(3.003,-3.094) 8(3.003,-1.824)
  silkscreen extent -4.12,-6.18 1.27,-1.28, body extent -3.57,-6.68 4.74,-0.78, height 0.25
"MOUNTING HOLE" [mm] "Mounting Hole PTH M2.5"
  round 5 hole 2.75: 1(-0.048,3.158)
  body extent -3.04,0.7 2.74,5.7
OPA2192IDR [mm] "IC OPAMP GP 2 CIRCUIT 8SOIC"
  rrect25% 1.97x0.6 smd paste+0 mask+0.102: 1(-2.594,1.717) 2(-2.594,0.447) 3(-2.594,-0.823) 4(-2.594,-2.093) 5(2.346,-2.093) 6(2.346,-0.823) 7(2.346,0.447) 8(2.346,1.717)
  silkscreen extent -4.26,-2.71 1.83,2.34, body extent -3.12,-2.64 2.87,2.26, height 1.75
RC0402FR-074K7L [mm] "RES 4.7K OHM 1% 1/16W 0402"
  rect 0.5x0.45 smd: 1(-0.309,0.619) 2(0.441,0.619)
  body extent -0.46,0.34 0.59,0.89, height 0.4
RC0402FR-0722KL [mm] "RES 22K OHM 1% 1/16W 0402"
  rect 0.5x0.45 smd: 1(-0.459,1.105) 2(0.291,1.105)
  body extent -0.61,0.83 0.44,1.38, height 0.4
RC0402FR-1333KL [mm] "RES 33K OHM 1% 1/16W 0402"
  rect 0.5x0.45 smd: 1(-0.42,0.598) 2(0.33,0.598)
  body extent -0.57,0.32 0.48,0.87, height 0.4
RC0603FR-071K8L [mil] "RES 1.8K OHM 1% 1/10W 0603"
  rrect25% 35x35 smd: 1(40.27,26) 2(40.27,-34)
  body extent 25,-30 56,32, height 22
RC0603FR-071KL [mm] "RES 1K OHM 1% 1/10W 0603"
  rect 1.059x1.012 smd paste+0 mask+0: 1(-1.032,1.887) 2(0.722,1.887)
  silkscreen extent -1.56,0.98 1.25,2.79, body extent -2.06,0.88 1.75,2.89, height 0.25
RC0603FR-0710RL [mm] "RES 10 OHM 1% 1/10W 0603"
  rect 0.6x0.8 smd: 1(-0.636,1.278) 2(0.664,1.278)
  body extent -0.84,0.83 0.86,1.73, height 0.55
RC0603FR-0747RL [mm] "RES 47 OHM 1% 1/10W 0603"
  rect 1.1x1 smd: 1(-0.897,-0.886) 2(0.803,-0.886)
  body extent -0.85,-1.29 0.75,-0.49, height 0.55
RG2012N-103-W-T1 [mm] "RES SMD 10K OHM 0.05% 1/8W 0805"
  rect 0.95x1.35 smd: 1(-0.761,1.106) 2(0.789,1.106)
  body extent -1.09,0.38 1.11,1.83, height 0.5
RMCF0402FT187K [mm] "RES 187K OHM 1% 1/16W 0402"
  rect 0.59x0.6 smd paste+0 mask+0.102: 1(-0.368,-0.845) 2(0.472,-0.845)
  body extent -0.45,-1.09 0.55,-0.6, height 0.4
RNCF0603BTE100R [mm] "100 Ohms ±0.1% 0.167W, 1/6W Chip"
  rect 0.87x0.93 smd paste+0 mask+0.102: 1(-0.857,1.536) 2(0.653,1.536)
  body extent -0.88,1.14 0.67,1.94, height 0.55
RT0402BRD0715KL [mm] "RES SMD 15K OHM 0.1% 1/16W 0402"
  rect 0.76x0.672 smd paste+0 mask+0: 1(-2.871,-0.329) 2(-1.919,-0.329)
  silkscreen extent -3.25,-1.07 -1.54,0.41, body extent -3.45,-0.87 -1.34,0.21, height 0.25
RT0603DRD072K2L [mm] "RES SMD 2.2K OHM 0.5% 1/10W 0603"
  rect 0.859x0.912 smd paste+0 mask+0: 1(-0.724,1.473) 2(0.83,1.473)
  silkscreen extent -1.15,0.62 1.26,2.33, body extent -1.4,0.77 1.51,2.18, height 0.25
"Solder Jumper" [mil]
  oct 15.75x30 smd rot 135: 1(-18.76,35.98)
  oct 15x30 smd rot 45: 1(-18.76,19.98) 2(17.24,34.98)
  rect 26x26 smd rot 45: 2(12.24,27.98)
  oct 15x30 smd rot 135: 2(17.24,20.98)
SPEF110100 [mm] "1.5mm-travel Vertical Type SPEF Series"
  round 3 hole 1.3: 1(5.34,2.97) 2(5.32,-2.87) 3(-6.83,2.87) 4(-6.83,-2.85)
  round 1.524 hole 1.5: 5(-5.63,0.08) 6(4.12,-0.02)
  silkscreen extent -8.78,-5.17 7.35,5.21, body extent -7.02,-4.45 5.52,4.55, height 15.65
STM32F303RET6 [mm]
  rect 1.788x0.312 smd paste+0 mask+0: 1(-5.683,5.543)
  rrect100% 1.788x0.312 smd paste+0 mask+0: 2(-5.683,5.043) 3(-5.683,4.543) 4(-5.683,4.043) 5(-5.683,3.543) 6(-5.683,3.043) 7(-5.683,2.543) 8(-5.683,2.043) 9(-5.683,1.543) 10(-5.683,1.043) 11(-5.683,0.543) 12(-5.683,0.043) 13(-5.683,-0.457) 14(-5.683,-0.957) 15(-5.683,-1.457) 16(-5.683,-1.957) 33(5.699,-1.957) 34(5.699,-1.457) 35(5.699,-0.957) 36(5.699,-0.457) 37(5.699,0.043) 38(5.699,0.543) 39(5.699,1.043) 40(5.699,1.543) 41(5.699,2.043) 42(5.699,2.543) 43(5.699,3.043) 44(5.699,3.543) 45(5.699,4.043) 46(5.699,4.543) 47(5.699,5.043) 48(5.699,5.543)
  rrect100% 0.312x1.788 smd paste+0 mask+0: 17(-3.742,-3.898) 18(-3.242,-3.898) 19(-2.742,-3.898) 20(-2.242,-3.898) 21(-1.742,-3.898) 22(-1.242,-3.898) 23(-0.742,-3.898) 24(-0.242,-3.898) 25(0.258,-3.898) 26(0.758,-3.898) 27(1.258,-3.898) 28(1.758,-3.898) 29(2.258,-3.898) 30(2.758,-3.898) 31(3.258,-3.898) 32(3.758,-3.898) 49(3.758,7.484) 50(3.258,7.484) 51(2.758,7.484) 52(2.258,7.484) 53(1.758,7.484) 54(1.258,7.484) 55(0.758,7.484) 56(0.258,7.484) 57(-0.242,7.484) 58(-0.742,7.484) 59(-1.242,7.484) 60(-1.742,7.484) 61(-2.242,7.484) 62(-2.742,7.484) 63(-3.242,7.484) 64(-3.742,7.484)
  silkscreen extent -6.08,-2.46 4.26,6.5, body extent -7.08,-5.29 7.09,8.88, height 0.25
TEST_POINT_SMD [mm]
  round 1 smd: 1(-0.027,2.283)
TEST_POINT_TH [mm]
  round 1.6 hole 0.8: 1(3.588,48.418)
TL3301AF260QG [mm] "SWITCH TACTILE SPST-NO 0.05A 12V"
  rect 2.1x1.4 smd: 1(-4.434,2.277) 2(4.666,2.277) 3(-4.434,-2.223) 4(4.666,-2.223)
  silkscreen extent -6.16,-2.97 3.12,3.03, body extent -2.88,-2.97 3.12,3.03, height 5.3
TLV1702AIDGKR [mm] "IC COMPARATOR 2CH 8-VSSOP"
  rrect25% 1.47x0.48 smd paste+0 mask+0.102: 1(-2.162,0.916) 2(-2.162,0.266) 3(-2.162,-0.384) 4(-2.162,-1.034) 5(2.138,-1.034) 6(2.138,-0.384) 7(2.138,0.266) 8(2.138,0.916)
  silkscreen extent -3.63,-1.59 1.49,1.48, body extent -2.46,-1.56 2.44,1.44, height 1.1
TPS7B8233QWDRVRQ1 [mm] "AUTOMOTIVE 300-MA, OFF-BATTERY ("
  rrect25% 0.69x0.32 smd: 1(-3.546,0.92) 2(-3.546,0.27) 3(-3.546,-0.38) 4(-1.506,-0.38) 5(-1.506,0.27) 6(-1.506,0.92)
  rect 1x1.6 smd paste-2: 7(-2.526,0.27)
  silkscreen extent -4.53,-0.86 -1.53,1.4, body extent -3.53,-0.73 -1.53,1.27, height 0.8
TPS25961DRVR [mm] "2.7-V TO 19-V 100-M EFUSE WITH O"
  rect 0.6x0.35 smd: 1(-0.99,-0.653) 2(-0.99,-1.303) 3(-0.99,-1.953) 4(1.11,-1.953) 5(1.11,-1.303) 6(1.11,-0.653)
  rect 1.1x1.7 smd: 7(0.06,-1.303)
  silkscreen extent -1.34,-0.03 -1.24,0.07, body extent -0.99,-2.3 1.11,-0.3, height 0.8
TPS61041DBVR [mm] "IC LED DRVR RGLTR PWM SOT23-5"
  rrect18% 0.8x0.55 smd: 1(-1.284,0.745) 2(-1.284,-0.205) 3(-1.284,-1.155) 4(1.266,-1.155) 5(1.266,0.745)
  silkscreen extent -1.41,-1.76 0.49,1.69, body extent -1.43,-1.67 1.41,1.26, height 1.08

## Part data
C1 C2 C3 C4 C10 C11 C12: "CAP CER 10UF 10V X7R 0805", Capacitance=10µF, Case Code (Imperial)=0805, Case Code (Metric)=2012, Dielectric=X7R, Dielectric Material=Ceramic, Manufacturer=Murata, Manufacturer Lifecycle Status="IN PRODUCTION", Manufacturer Package Identifier="0805 (2012 metric)", Max Operating Temperature=125°C, Min Operating Temperature=-55°C, Supplier Part Number 1=490-10516-1-ND, Tolerance=10%, Voltage Rating=10V, Case/Package=0805, Category="Ceramic Capacitors", ComponentLink1Description=https://datasheet.octopart.com:443/GRM21BR71A106KA73L-Murata-datasheet-22122223.pdf?src-supplier=Upverter, ComponentLink1URL=https://datasheet.octopart.com:443/GRM21BR71A106KA73L-Murata-datasheet-22122223.pdf?src-supplier=Upverter, ComponentLink2Description=https://datasheet.octopart.com:443/GRM21BR71A106KA73L-Murata-datasheet-66077114.pdf?src-supplier=element14+APAC, ComponentLink2URL=https://datasheet.octopart.com:443/GRM21BR71A106KA73L-Murata-datasheet-66077114.pdf?src-supplier=element14+APAC, ComponentLink3Description=https://datasheet.octopart.com:443/GRM21BR71A106KA73L-Murata-datasheet-165579666.pdf?src-supplier=TME, ComponentLink3URL=https://datasheet.octopart.com:443/GRM21BR71A106KA73L-Murata-datasheet-165579666.pdf?src-supplier=TME, ComponentLink4Description=https://datasheet.octopart.com:443/GRM21BR71A106KA73L-Murata-datasheet-140707598.pdf?src-supplier=Ciiva, ComponentLink4URL=https://datasheet.octopart.com:443/GRM21BR71A106KA73L-Murata-datasheet-140707598.pdf?src-supplier=Ciiva, ComponentLink5Description=https://datasheet.octopart.com:443/GRM21BR71A106KA73L-Murata-datasheet-138744898.pdf?src-supplier=Ciiva, ComponentLink5URL=https://datasheet.octopart.com:443/GRM21BR71A106KA73L-Murata-datasheet-138744898.pdf?src-supplier=Ciiva, ComponentLink6Description=https://datasheet.octopart.com/GRM21BR71A106KA73L-Murata-datasheet-12515295.pdf, ComponentLink6URL=https://datasheet.octopart.com/GRM21BR71A106KA73L-Murata-datasheet-12515295.pdf, ComponentLink7Description=https://datasheet.octopart.com/GRM21BR71A106KA73L-Murata-datasheet-12510076.pdf, ComponentLink7URL=https://datasheet.octopart.com/GRM21BR71A106KA73L-Murata-datasheet-12510076.pdf, ComponentLink8Description=https://datasheet.octopart.com/GRM21BR71A106KA73L-Murata-datasheet-11978611.pdf, ComponentLink8URL=https://datasheet.octopart.com/GRM21BR71A106KA73L-Murata-datasheet-11978611.pdf, ComponentLink9Description=https://datasheet.octopart.com/GRM21BR71A106KA73L-Murata-datasheet-10025737.pdf, ComponentLink9URL=https://datasheet.octopart.com/GRM21BR71A106KA73L-Murata-datasheet-10025737.pdf, ComponentLink10Description=https://datasheet.octopart.com/GRM21BR71A106KA73L-Murata-datasheet-8819587.pdf, ComponentLink10URL=https://datasheet.octopart.com/GRM21BR71A106KA73L-Murata-datasheet-8819587.pdf, ComponentLink11Description=https://datasheet.octopart.com/GRM21BR71A106KA73L-Murata-datasheet-38883396.pdf, ComponentLink11URL=https://datasheet.octopart.com/GRM21BR71A106KA73L-Murata-datasheet-38883396.pdf, ComponentLink12Description=https://datasheet.octopart.com:443/GRM21BR71A106KA73L-Murata-datasheet-151172660.pdf?src-supplier=Arrow.cn, ComponentLink12URL=https://datasheet.octopart.com:443/GRM21BR71A106KA73L-Murata-datasheet-151172660.pdf?src-supplier=Arrow.cn, ComponentLink13Description=http://sigma.octopart.com:80/reach_statement/Murata-company-16.pdf?src-supplier=Compliance+Statements, ComponentLink13URL=http://sigma.octopart.com:80/reach_statement/Murata-company-16.pdf?src-supplier=Compliance+Statements, Country of Origin="Japan, Mainland China, Philippines, Singapore, Thailand", Depth=1.25mm, Export Control Classification Number (ECCN) Code=EAR99, Harmonized Tariff Schedule (HTS) Code=8532.24.00.20, Height=1.25mm, Introduction Date=2013-11-20, Length=2mm, Lifecycle Status=Production, Manufacturer Part Number=GRM21BR71A106KA73L, Material=Ceramic, Mount="Surface Mount", Number of Pins=2, Number of Terminals=2, REACH SVHC=Yes, Schedule B="8532240020, 8532240020|8532240020, 8532240020|8532240020|8532240020, 8532240020|8532240020|8532240020|8532240020", Supplier 1=DigiKey, Termination=SMD/SMT, Thickness=1.25mm, Voltage Rating (DC)=10V, Weight=9.49709mg, Width=1.25mm
C5 C9 C13 C15 C21 C25: "CAP CER 0.1UF 50V X7R 0603", Capacitance=100nF, Case Code (Imperial)=0603, Case Code (Metric)=1608, Dielectric=X7R, Dielectric Material=Ceramic, Max Operating Temperature=125°C, Min Operating Temperature=-55°C, Tolerance=10%, Voltage=50V, Case/Package=0603, China RoHS=Compliant, ComponentLink1Description=https://datasheet.octopart.com:443/CC0603KRX7R9BB104-Yageo-datasheet-177165144.pdf?src-supplier=IHS, ComponentLink1URL=https://datasheet.octopart.com:443/CC0603KRX7R9BB104-Yageo-datasheet-177165144.pdf?src-supplier=IHS, ComponentLink2Description=https://datasheet.octopart.com:443/CC0603KRX7R9BB104-Yageo-datasheet-82288757.pdf?src-supplier=Upverter, ComponentLink2URL=https://datasheet.octopart.com:443/CC0603KRX7R9BB104-Yageo-datasheet-82288757.pdf?src-supplier=Upverter, ComponentLink3Description=https://datasheet.octopart.com:443/CC0603KRX7R9BB104-Yageo-datasheet-68298032.pdf?src-supplier=Upverter, ComponentLink3URL=https://datasheet.octopart.com:443/CC0603KRX7R9BB104-Yageo-datasheet-68298032.pdf?src-supplier=Upverter, ComponentLink4Description=https://datasheet.octopart.com:443/CC0603KRX7R9BB104-Yageo-Group-datasheet-189192896.pdf?src-supplier=Future+Electronics, ComponentLink4URL=https://datasheet.octopart.com:443/CC0603KRX7R9BB104-Yageo-Group-datasheet-189192896.pdf?src-supplier=Future+Electronics, ComponentLink5Description=https://datasheet.octopart.com:443/CC0603KRX7R9BB104-Yageo-datasheet-166511530.pdf?src-supplier=Future+Electronics, ComponentLink5URL=https://datasheet.octopart.com:443/CC0603KRX7R9BB104-Yageo-datasheet-166511530.pdf?src-supplier=Future+Electronics, ComponentLink6Description=https://datasheet.octopart.com:443/CC0603KRX7R9BB104-Yageo-datasheet-137700082.pdf?src-supplier=Future+Electronics, ComponentLink6URL=https://datasheet.octopart.com:443/CC0603KRX7R9BB104-Yageo-datasheet-137700082.pdf?src-supplier=Future+Electronics, ComponentLink7Description=https://datasheet.octopart.com:443/CC0603KRX7R9BB104-Yageo-datasheet-137700084.pdf?src-supplier=Future+Electronics, ComponentLink7URL=https://datasheet.octopart.com:443/CC0603KRX7R9BB104-Yageo-datasheet-137700084.pdf?src-supplier=Future+Electronics, ComponentLink8Description=https://datasheet.octopart.com:443/CC0603KRX7R9BB104-Yageo-datasheet-27626582.pdf?src-supplier=Future+Electronics, ComponentLink8URL=https://datasheet.octopart.com:443/CC0603KRX7R9BB104-Yageo-datasheet-27626582.pdf?src-supplier=Future+Electronics, ComponentLink9Description=https://datasheet.octopart.com:443/CC0603KRX7R9BB104-Yageo-datasheet-15895757.pdf?src-supplier=Future+Electronics, ComponentLink9URL=https://datasheet.octopart.com:443/CC0603KRX7R9BB104-Yageo-datasheet-15895757.pdf?src-supplier=Future+Electronics, ComponentLink10Description=https://datasheet.octopart.com:443/CC0603KRX7R9BB104-Yageo-datasheet-8324192.pdf?src-supplier=Future+Electronics, ComponentLink10URL=https://datasheet.octopart.com:443/CC0603KRX7R9BB104-Yageo-datasheet-8324192.pdf?src-supplier=Future+Electronics, ComponentLink11Description=https://datasheet.octopart.com/CC0603KRX7R9BB104-Yageo-datasheet-10883670.pdf, ComponentLink11URL=https://datasheet.octopart.com/CC0603KRX7R9BB104-Yageo-datasheet-10883670.pdf, ComponentLink12Description=https://datasheet.octopart.com/CC0603KRX7R9BB104-Yageo-datasheet-12526321.pdf, ComponentLink12URL=https://datasheet.octopart.com/CC0603KRX7R9BB104-Yageo-datasheet-12526321.pdf, ComponentLink13Description=https://datasheet.octopart.com:443/CC0603KRX7R9BB104-Yageo-datasheet-181968726.pdf?src-supplier=Newark, ComponentLink13URL=https://datasheet.octopart.com:443/CC0603KRX7R9BB104-Yageo-datasheet-181968726.pdf?src-supplier=Newark, ComponentLink14Description=https://datasheet.octopart.com:443/CC0603KRX7R9BB104-Yageo-datasheet-499490.pdf?src-supplier=Newark, ComponentLink14URL=https://datasheet.octopart.com:443/CC0603KRX7R9BB104-Yageo-datasheet-499490.pdf?src-supplier=Newark, ComponentLink15Description=https://datasheet.octopart.com:443/CC0603KRX7R9BB104-Yageo-datasheet-62336348.pdf?src-supplier=Newark, ComponentLink15URL=https://datasheet.octopart.com:443/CC0603KRX7R9BB104-Yageo-datasheet-62336348.pdf?src-supplier=Newark, ComponentLink16Description=https://datasheet.octopart.com:443/CC0603KRX7R9BB104-Yageo-datasheet-147453679.pdf?src-supplier=Newark, ComponentLink16URL=https://datasheet.octopart.com:443/CC0603KRX7R9BB104-Yageo-datasheet-147453679.pdf?src-supplier=Newark, ComponentLink17Description=https://datasheet.octopart.com:443/CC0603KRX7R9BB104-Yageo-datasheet-151948686.pdf?src-supplier=Farnell, ComponentLink17URL=https://datasheet.octopart.com:443/CC0603KRX7R9BB104-Yageo-datasheet-151948686.pdf?src-supplier=Farnell, ComponentLink18Description=https://datasheet.octopart.com:443/CC0603KRX7R9BB104-Yageo-datasheet-500777.pdf?src-supplier=Farnell, ComponentLink18URL=https://datasheet.octopart.com:443/CC0603KRX7R9BB104-Yageo-datasheet-500777.pdf?src-supplier=Farnell, ComponentLink19Description=https://datasheet.octopart.com:443/CC0603KRX7R9BB104-Yageo-datasheet-178019014.pdf?src-supplier=Burklin+Elektronik, ComponentLink19URL=https://datasheet.octopart.com:443/CC0603KRX7R9BB104-Yageo-datasheet-178019014.pdf?src-supplier=Burklin+Elektronik, ComponentLink20Description=https://datasheet.octopart.com:443/CC0603KRX7R9BB104-Yageo-Group-datasheet-165992755.pdf?src-supplier=ODG+(Origin+Data+Global), ComponentLink20URL=https://datasheet.octopart.com:443/CC0603KRX7R9BB104-Yageo-Group-datasheet-165992755.pdf?src-supplier=ODG+(Origin+Data+Global), ComponentLink21Description=https://datasheet.octopart.com:443/CC0603KRX7R9BB104-Yageo-datasheet-140260305.pdf?src-supplier=SOS+electronic, ComponentLink21URL=https://datasheet.octopart.com:443/CC0603KRX7R9BB104-Yageo-datasheet-140260305.pdf?src-supplier=SOS+electronic, ComponentLink22Description=https://datasheet.octopart.com:443/CC0603KRX7R9BB104-Yageo-datasheet-120101875.pdf?src-supplier=Megastar, ComponentLink22URL=https://datasheet.octopart.com:443/CC0603KRX7R9BB104-Yageo-datasheet-120101875.pdf?src-supplier=Megastar, ComponentLink23Description=https://datasheet.octopart.com:443/CC0603KRX7R9BB104-Yageo-datasheet-8701427.pdf?src-supplier=element14, ComponentLink23URL=https://datasheet.octopart.com:443/CC0603KRX7R9BB104-Yageo-datasheet-8701427.pdf?src-supplier=element14, ComponentLink24Description=https://datasheet.octopart.com:443/CC0603KRX7R9BB104-Yageo-datasheet-5301394.pdf?src-supplier=element14, ComponentLink24URL=https://datasheet.octopart.com:443/CC0603KRX7R9BB104-Yageo-datasheet-5301394.pdf?src-supplier=element14, ComponentLink25Description=https://datasheet.octopart.com:443/CC0603KRX7R9BB104-Yageo-datasheet-17600895.pdf?src-supplier=TME, ComponentLink25URL=https://datasheet.octopart.com:443/CC0603KRX7R9BB104-Yageo-datasheet-17600895.pdf?src-supplier=TME, ComponentLink26Description=http://sigma.octopart.com:80/15889575/rohs_statement/Yageo-CC0603KRX7R9BB104.pdf?src-supplier=Compliance+Statements, ComponentLink26URL=http://sigma.octopart.com:80/15889575/rohs_statement/Yageo-CC0603KRX7R9BB104.pdf?src-supplier=Compliance+Statements, ComponentLink27Description=http://sigma.octopart.com:80/rohs_statement/Surface-Mount-Ceramic-Multilayer-Capacitors%3B-General-Purpose-%26-High-Capacitance-Class-2%2C-X7R-Yageo-family-124.pdf?src-supplier=Compliance+Statements, ComponentLink27URL=http://sigma.octopart.com:80/rohs_statement/Surface-Mount-Ceramic-Multilayer-Capacitors%3B-General-Purpose-%26-High-Capacitance-Class-2%2C-X7R-Yageo-family-124.pdf?src-supplier=Compliance+Statements, ComponentLink28Description=http://sigma.octopart.com:80/reach_statement/Surface-Mount-Ceramic-Multilayer-Capacitors%3B-General-Purpose-%26-High-Capacitance-Class-2%2C-X7R-Yageo-family-125.pdf?src-supplier=Compliance+Statements, ComponentLink28URL=http://sigma.octopart.com:80/reach_statement/Surface-Mount-Ceramic-Multilayer-Capacitors%3B-General-Purpose-%26-High-Capacitance-Class-2%2C-X7R-Yageo-family-125.pdf?src-supplier=Compliance+Statements, ComponentLink29Description=http://sigma.octopart.com:80/conflict_mineral_statement/Yageo-company-3.pdf?src-supplier=Compliance+Statements, ComponentLink29URL=http://sigma.octopart.com:80/conflict_mineral_statement/Yageo-company-3.pdf?src-supplier=Compliance+Statements, Country of Origin="Mainland China, Taiwan", Depth=800µm, Export Control Classification Number (ECCN) Code=EAR99, Halogen Free="Halogen Free", Harmonized Tariff Schedule (HTS) Code=8532.24.00.20, Height=800µm, Introduction Date=2005-08-18, Lead Free="Lead Free", Length=1.6mm, Lifecycle Status=Production, Material=Ceramic, Mount="Surface Mount", Number of Pins=2, Number of Terminals=2, Radiation Hardening=No, REACH SVHC=Yes, Schedule B="8532240020, 8532240020|8532240020, 8532240020|8532240020|8532240020, 8532240020|8532240020|8532240020|8532240020", Termination=SMD/SMT, Thickness=889µm, Voltage Rating=50V, Voltage Rating (DC)=50V, Width=800µm
C6 C14 C16: "CAP CER 10UF 25V X5R 0805", Capacitance=10µF, Case Code (Imperial)=0805, Case Code (Metric)=2012, Dielectric=X5R, Dielectric Material=Ceramic, Manufacturer=Murata, Manufacturer Lifecycle Status="IN PRODUCTION", Max Operating Temperature=85°C, Min Operating Temperature=-55°C, Supplier Part Number 1=490-5523-1-ND, Tolerance=10%, Voltage=25V, Case/Package=0805, Category="Ceramic Capacitors", ComponentLink1Description=https://datasheet.octopart.com:443/GRM21BR61E106KA73L-Murata-datasheet-99353849.pdf?src-supplier=Upverter, ComponentLink1URL=https://datasheet.octopart.com:443/GRM21BR61E106KA73L-Murata-datasheet-99353849.pdf?src-supplier=Upverter, ComponentLink2Description=https://datasheet.octopart.com:443/GRM21BR61E106KA73L-Murata-datasheet-8080374.pdf?src-supplier=Upverter, ComponentLink2URL=https://datasheet.octopart.com:443/GRM21BR61E106KA73L-Murata-datasheet-8080374.pdf?src-supplier=Upverter, ComponentLink3Description=https://datasheet.octopart.com:443/GRM21BR61E106KA73L-Murata-datasheet-10030887.pdf?src-supplier=element14+APAC, ComponentLink3URL=https://datasheet.octopart.com:443/GRM21BR61E106KA73L-Murata-datasheet-10030887.pdf?src-supplier=element14+APAC, ComponentLink4Description=https://datasheet.octopart.com:443/GRM21BR61E106KA73L-Murata-datasheet-62320250.pdf?src-supplier=element14+APAC, ComponentLink4URL=https://datasheet.octopart.com:443/GRM21BR61E106KA73L-Murata-datasheet-62320250.pdf?src-supplier=element14+APAC, ComponentLink5Description=https://datasheet.octopart.com:443/GRM21BR61E106KA73L-Murata-datasheet-141278247.pdf?src-supplier=Geoflip, ComponentLink5URL=https://datasheet.octopart.com:443/GRM21BR61E106KA73L-Murata-datasheet-141278247.pdf?src-supplier=Geoflip, ComponentLink6Description=https://datasheet.octopart.com/GRM21BR61E106KA73L-Murata-datasheet-12515295.pdf, ComponentLink6URL=https://datasheet.octopart.com/GRM21BR61E106KA73L-Murata-datasheet-12515295.pdf, ComponentLink7Description=https://datasheet.octopart.com/GRM21BR61E106KA73L-Murata-datasheet-12510076.pdf, ComponentLink7URL=https://datasheet.octopart.com/GRM21BR61E106KA73L-Murata-datasheet-12510076.pdf, ComponentLink8Description=https://datasheet.octopart.com/GRM21BR61E106KA73L-Murata-datasheet-11978611.pdf, ComponentLink8URL=https://datasheet.octopart.com/GRM21BR61E106KA73L-Murata-datasheet-11978611.pdf, ComponentLink9Description=https://datasheet.octopart.com/GRM21BR61E106KA73L-Murata-datasheet-10025737.pdf, ComponentLink9URL=https://datasheet.octopart.com/GRM21BR61E106KA73L-Murata-datasheet-10025737.pdf, ComponentLink10Description=https://datasheet.octopart.com/GRM21BR61E106KA73L-Murata-datasheet-8819587.pdf, ComponentLink10URL=https://datasheet.octopart.com/GRM21BR61E106KA73L-Murata-datasheet-8819587.pdf, ComponentLink11Description=https://datasheet.octopart.com/GRM21BR61E106KA73L-Murata-datasheet-14397508.pdf, ComponentLink11URL=https://datasheet.octopart.com/GRM21BR61E106KA73L-Murata-datasheet-14397508.pdf, ComponentLink12Description=https://datasheet.octopart.com:443/GRM21BR61E106KA73L-Murata-datasheet-11549874.pdf?src-supplier=Seeed+Studio, ComponentLink12URL=https://datasheet.octopart.com:443/GRM21BR61E106KA73L-Murata-datasheet-11549874.pdf?src-supplier=Seeed+Studio, ComponentLink13Description=https://datasheet.octopart.com:443/GRM21BR61E106KA73L-Murata-datasheet-17853673.pdf?src-supplier=Newark, ComponentLink13URL=https://datasheet.octopart.com:443/GRM21BR61E106KA73L-Murata-datasheet-17853673.pdf?src-supplier=Newark, ComponentLink14Description=https://datasheet.octopart.com:443/GRM21BR61E106KA73L-Murata-datasheet-165579666.pdf?src-supplier=TME, ComponentLink14URL=https://datasheet.octopart.com:443/GRM21BR61E106KA73L-Murata-datasheet-165579666.pdf?src-supplier=TME, ComponentLink15Description=https://datasheet.octopart.com:443/GRM21BR61E106KA73L-Murata-datasheet-59876780.pdf?src-supplier=TME, ComponentLink15URL=https://datasheet.octopart.com:443/GRM21BR61E106KA73L-Murata-datasheet-59876780.pdf?src-supplier=TME, ComponentLink16Description=https://datasheet.octopart.com:443/GRM21BR61E106KA73L-Murata-datasheet-140707569.pdf?src-supplier=Ciiva, ComponentLink16URL=https://datasheet.octopart.com:443/GRM21BR61E106KA73L-Murata-datasheet-140707569.pdf?src-supplier=Ciiva, ComponentLink17Description=https://datasheet.octopart.com:443/GRM21BR61E106KA73L-Murata-datasheet-138744870.pdf?src-supplier=Ciiva, ComponentLink17URL=https://datasheet.octopart.com:443/GRM21BR61E106KA73L-Murata-datasheet-138744870.pdf?src-supplier=Ciiva, ComponentLink18Description=https://datasheet.octopart.com:443/GRM21BR61E106KA73L-Murata-datasheet-22122223.pdf?src-supplier=Future+Electronics, ComponentLink18URL=https://datasheet.octopart.com:443/GRM21BR61E106KA73L-Murata-datasheet-22122223.pdf?src-supplier=Future+Electronics, ComponentLink19Description=https://datasheet.octopart.com:443/GRM21BR61E106KA73L-Murata-datasheet-12551729.pdf?src-supplier=Future+Electronics, ComponentLink19URL=https://datasheet.octopart.com:443/GRM21BR61E106KA73L-Murata-datasheet-12551729.pdf?src-supplier=Future+Electronics, ComponentLink20Description=https://datasheet.octopart.com:443/GRM21BR61E106KA73L-Murata-datasheet-7550257.pdf?src-supplier=Farnell, ComponentLink20URL=https://datasheet.octopart.com:443/GRM21BR61E106KA73L-Murata-datasheet-7550257.pdf?src-supplier=Farnell, ComponentLink21Description=http://sigma.octopart.com:80/reach_statement/Murata-company-16.pdf?src-supplier=Compliance+Statements, ComponentLink21URL=http://sigma.octopart.com:80/reach_statement/Murata-company-16.pdf?src-supplier=Compliance+Statements, Country of Origin="Japan, Mainland China, Philippines, Singapore, Thailand", Depth=1.25mm, Export Control Classification Number (ECCN) Code=EAR99, Harmonized Tariff Schedule (HTS) Code=8532.24.00.20, Height=1.25mm, Introduction Date=2012-06-14, Lead Free="Lead Free", Length=2mm, Lifecycle Status=Production, Manufacturer Part Number=GRM21BR61E106KA73L, Material=Ceramic, Mount="Surface Mount", Number of Pins=2, Number of Terminals=2, Radiation Hardening=No, REACH SVHC=Yes, Schedule B="8532240020, 8532240020|8532240020, 8532240020|8532240020|8532240020, 8532240020|8532240020|8532240020|8532240020", Supplier 1=DigiKey, Termination=SMD/SMT, Thickness=1.25mm, Voltage Rating=25V, Voltage Rating (DC)=25V, Width=1.25mm